# Altium PCB PCB1.PcbDoc
Units mm, origin at the board's own origin, x right, y up, seen from the top; angles counter-clockwise.
Board outline 149.99 x 90.04 mm, 2 copper layers (Top Layer, Bottom Layer); 22 components, 33 nets, 195 pads, 432 vias.
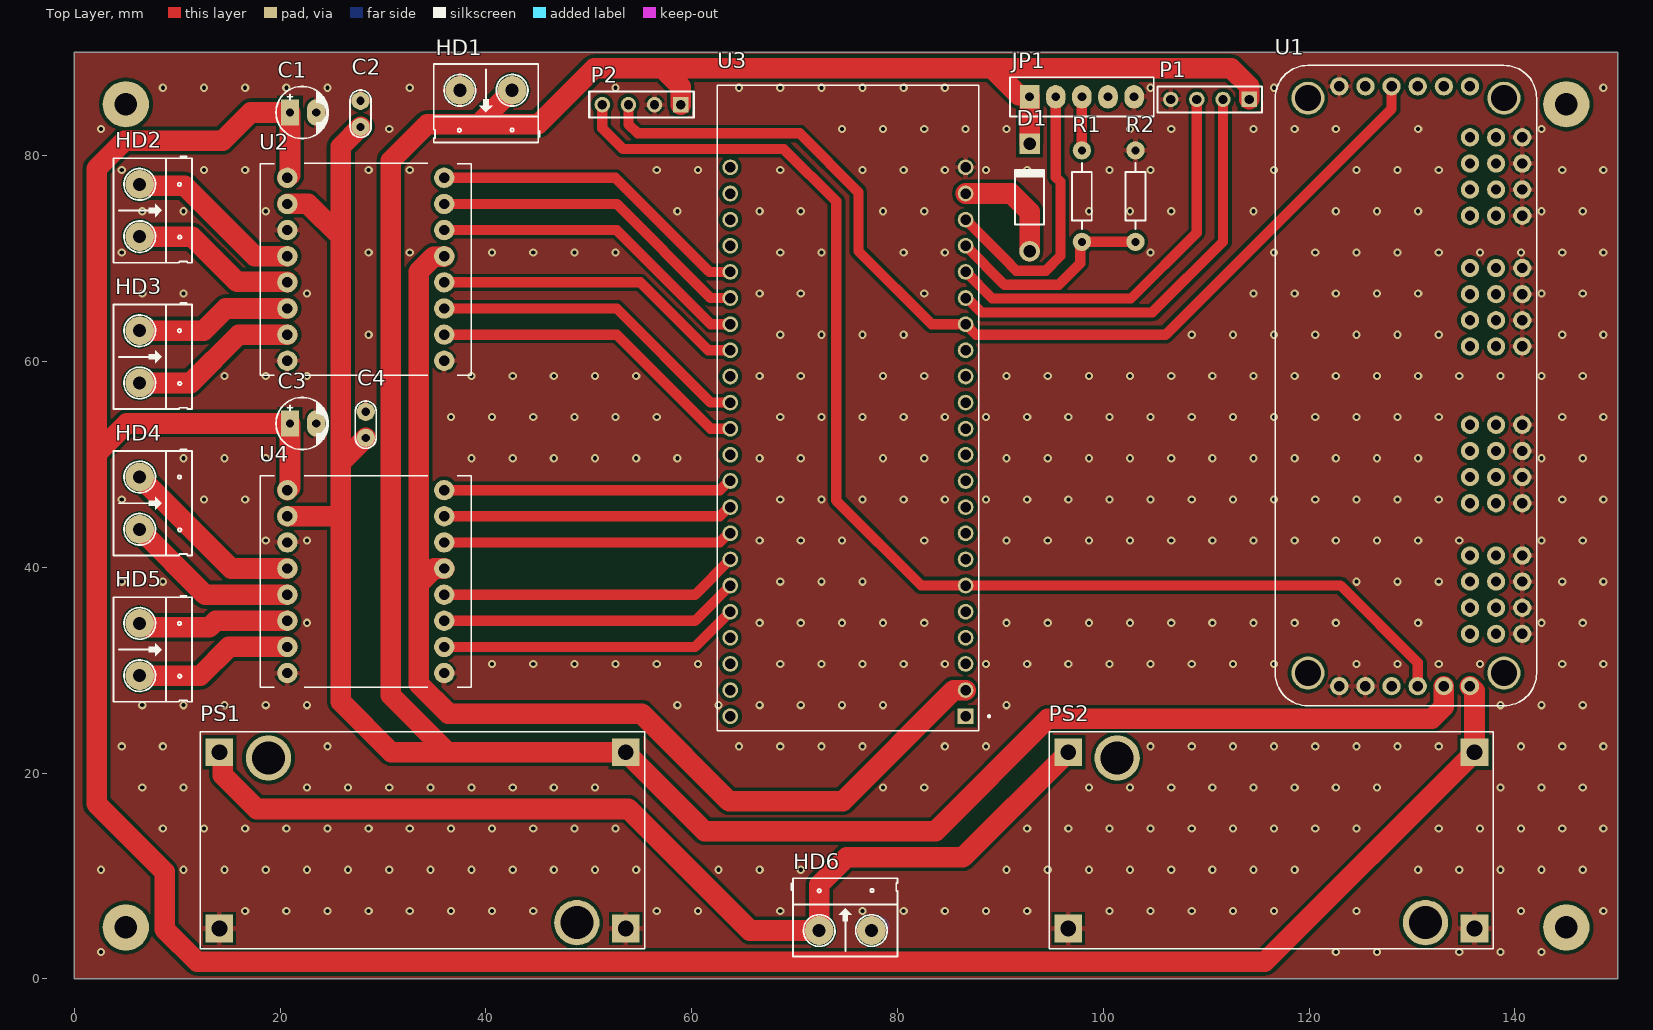
[diagram p0: Top Layer view]
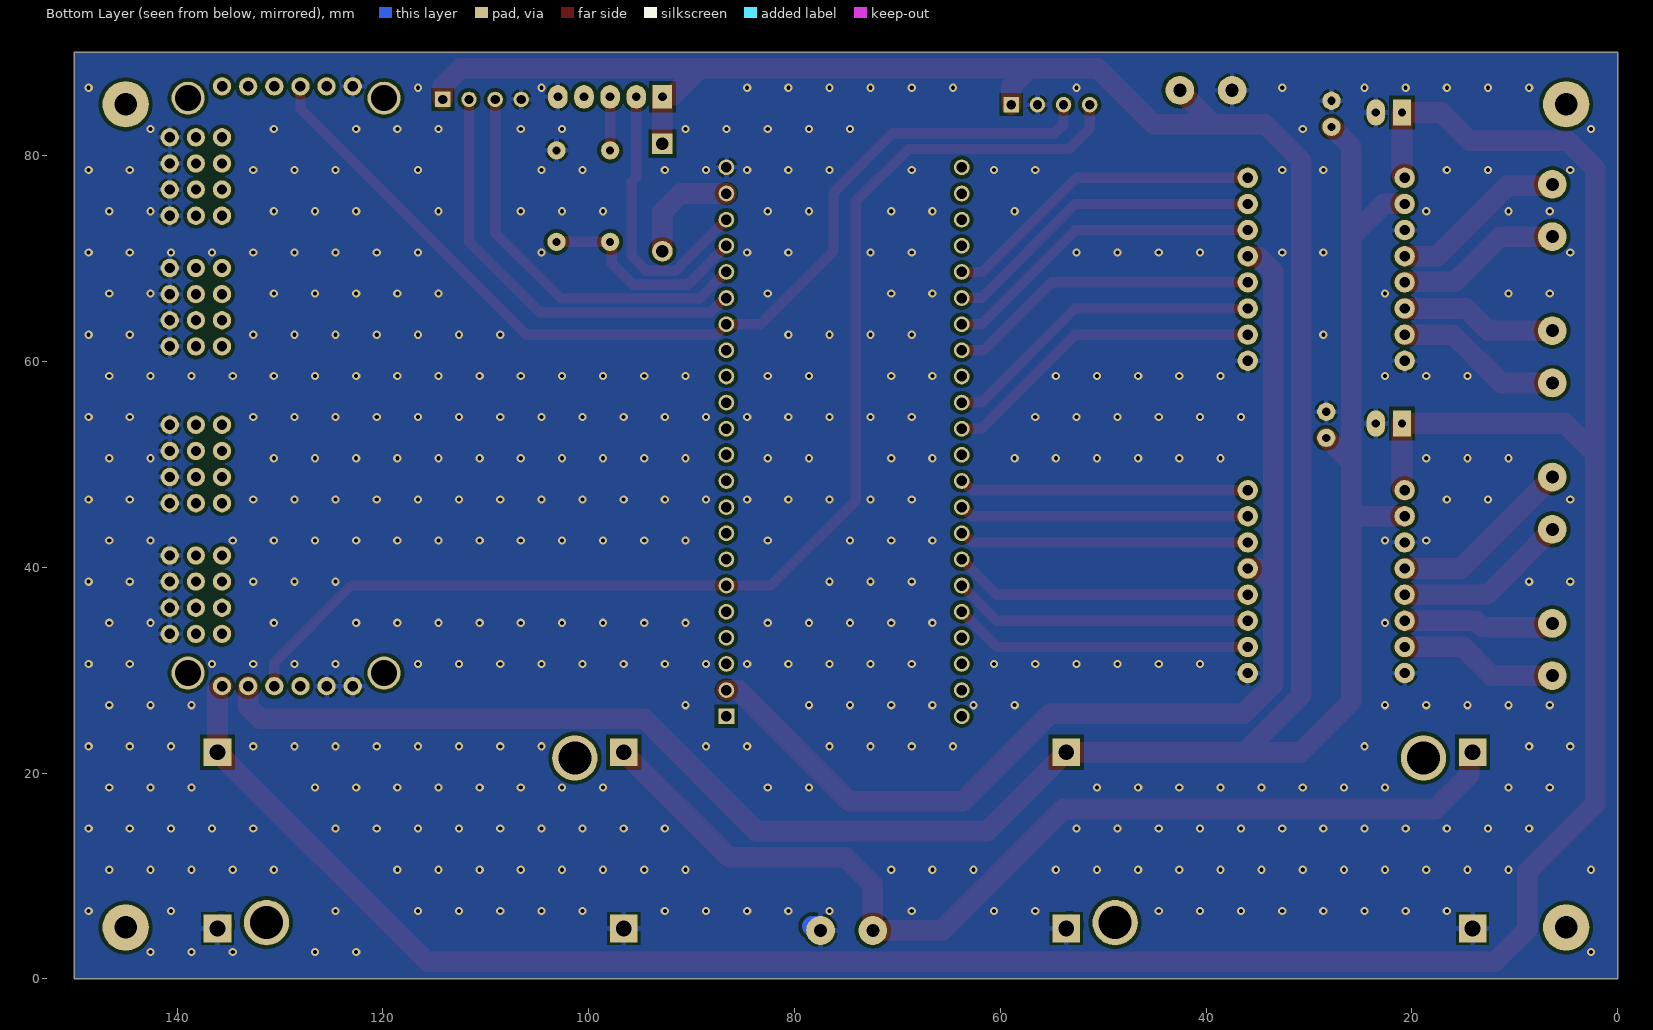
[diagram p1: Bottom Layer view, seen from below]
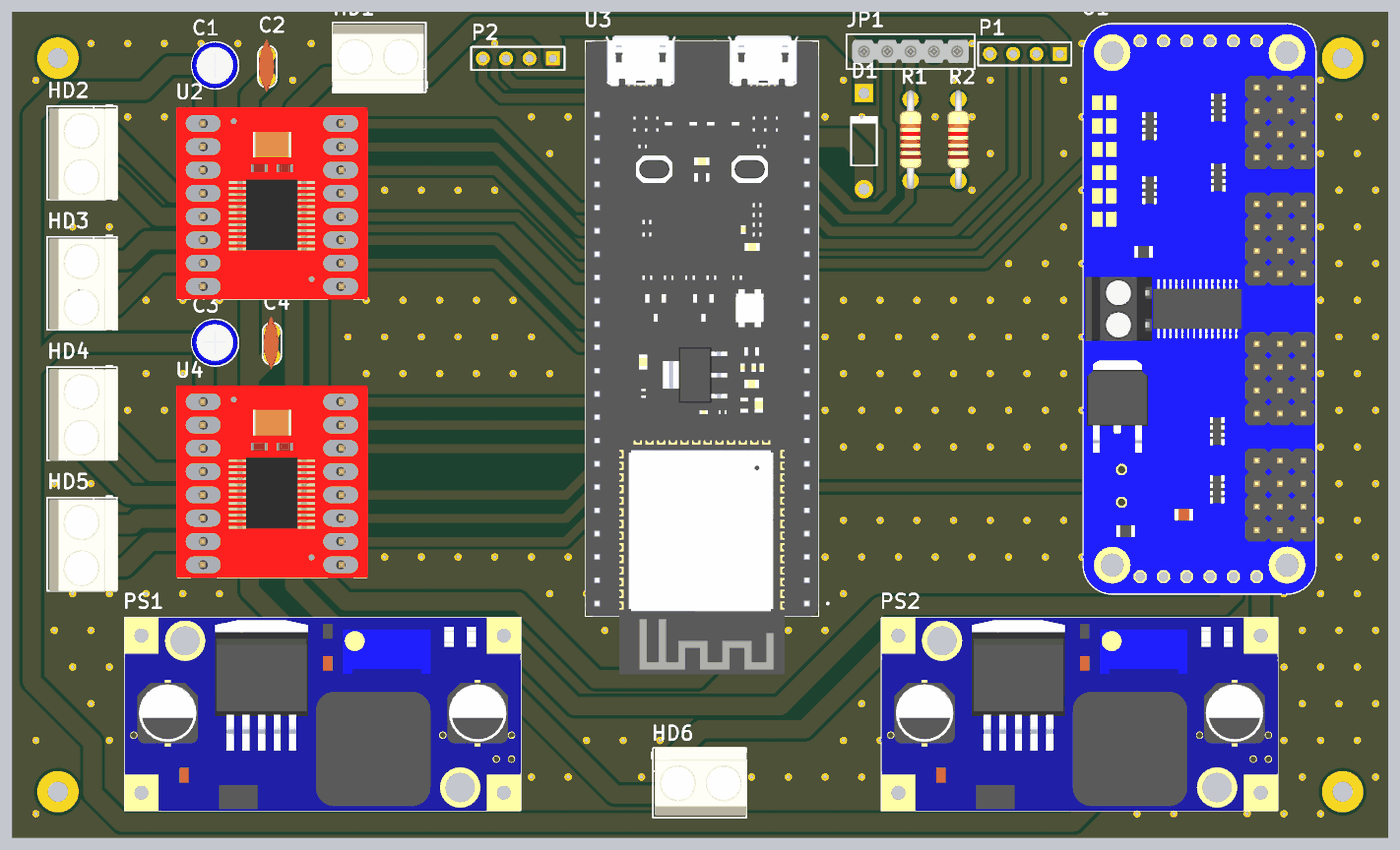
[diagram p2: 3D render of the assembled board from above, using the file's embedded part models]

## Layer stack, top to bottom
Top Solder: solder mask 0.0102, Solder Resist, Dk 3.5
Top Layer: signal copper 0.0356
Dielectric 1: dielectric 0.32, FR-4, Dk 4.8
Bottom Layer: signal copper 0.0356
Bottom Solder: solder mask 0.0102, Solder Resist, Dk 3.5

## Board outline
0,0 149.987,0 149.987,90.043 0,90.043

## Design rules (kind name [scope] priority, off if disabled: settings)
Clearance [All] p1: gap=0.35 ignorepadtopadclearanceinfootprint=FALSE
HoleSize [All] p1: absolutevalues=TRUE maxlimit=4 minlimit=0.025 maxpercent=80.000 minpercent=20.000
MinimumSolderMaskSliver [All] p1: minsoldermaskwidth=0.1
PolygonConnect [All] p1: connectstyle=Relief reliefconductorwidth=0.5 reliefentries=4 polygonreliefangle="90 Angle" airgapwidth=0.254
RoutingVias [All] p1: holewidth=0.711 width=1.27 viastyle="Through Hole" minholewidth=0.711 minwidth=1.27 maxholewidth=0.711 maxwidth=1.27
SilkToSilkClearance [All] p1 off: silktosilkclearance=0.254
SilkToSolderMaskClearance [IsPad] p1 off: minsilkscreentomaskgap=0.254 clearancetoexposedcopper=TRUE
SolderMaskExpansion [All] p1: expansion=0 istentingtop=FALSE
SupplyNets "Schematic Supply Nets_1" [InNet('GND_Logic')] p1: voltage=0.000
SupplyNets "Schematic Supply Nets_3" [InNet('6v')] p2: voltage=0.000
SupplyNets "Schematic Supply Nets_2" [InNet('5v1')] p3: voltage=0.000
SupplyNets "Schematic Supply Nets" [InNet('+12')] p4: voltage=0.000
Width [All] p1: maxlimit=2.5 minlimit=0.1 preferedwidth=2
26 further rules are at their usual default settings.

## Components (designator, comment, footprint, x,y, rotation, side; value= is the part's Value field where it differs from the comment)
C1 "470uf" CP1/2 20.955,84.201 r0 top
C2 "CAP gom" CN1 27.813,82.804 r90 top
C3 "470uf" CP1/2 20.955,53.975 r0 top
C4 "CAP gom" CN1 28.321,52.578 r90 top
D1 "Diode 11DQ03" DO-204AL 92.837,75.946 r90 top
HD1 "ESP32_Cam" HED2 42.545,86.36 r180 top value="Header 2"
HD2 "Trước-trái" HED2 6.35,77.216 r270 top value="Header 2"
HD3 "Trước-Phải" HED2 6.35,62.992 r270 top value="Header 2"
HD4 "Sau-Trái" HED2 6.35,48.768 r270 top value="Header 2"
HD5 "Sau-phải" HED2 6.35,34.544 r270 top value="Header 2"
HD6 "Header 2" HED2 72.39,4.699 r0 top
JP1 "HC-SR05" jam5 92.837,85.725 r180 top value="Connector 5"
P1 "Lida-x2" HDR1X4 114.173,85.471 r180 top
P2 "AS5600" HDR1X4 58.928,84.963 r180 top
PS1 "MC00100" CONV_MC00100 33.846,13.462 r0 top
PS2 "MC00100" CONV_MC00100 116.332,13.462 r0 top
R1 "1k" R1/4W 97.917,80.518 r270 top
R2 "2k" R1/4W 103.124,80.518 r270 top
U1 "PCA9685" MODULE_815 129.413,57.658 r90 top
U2 "TB6612FNG" TB6612FNG 28.321,68.961 r0 top
U3 "ESP32-S3-DEVKITC-1-N16R8V" XCVR_ESP32-S3-DEVKITC-1-N16R8V 75.184,55.497 r180 top
U4 "TB6612FNG" TB6612FNG 28.321,38.608 r0 top

## Footprints (in the part's own frame and the unit in brackets; to place one, negate y for a bottom-side part, rotate by r counter-clockwise, add the part's x,y. Pads: shape width x height; smd on the part's side, far side on the other; paste and mask are expansions set on the pad)
CN1 [mil]
  round 70 hole 31: 1(0,0) 2(100,0)
  silkscreen extent -40,-40 141,40, body extent -60,-30 170,37, height 265
CONV_MC00100 [mil]
  rect 105.63x105.63 / inner round 105.63 / far side rect 105.63x105.63 hole 60 mask+4.02: IN+(-777.5,337.5) IN-(-777.5,-337.5) OUT+(777.5,337.5) OUT-(777.5,-337.5)
  round 173.23 hole 125.98 mask+4.02: MH1(-590,315) MH2(590,-315)
  silkscreen extent -850,-415 850,415, body extent -850,-415 850,415, height 551
CP1/2 [mil]
  rect 70x100 hole 32: 1(0,0)
  oval 70x100 hole 32: 2(100,0)
  silkscreen extent -53,-100 147,100, body extent -54,-99 144,100, height 296
DO-204AL [mm] "Diode, Axial; Body 5.2 x 2.7 mm (LxDia. max), Lead Dia. 0.86 mm (max)"
  round 2 hole 1.2: 1(-5.23,0)
  rect 2x2 hole 1.2: 2(5.23,0)
  silkscreen extent -2.65,-1.41 2.75,1.4
HDR1X4 [mm] "Connector; Header; 4 Position"
  rect 1.5x1.5 hole 0.9: 1(0,0)
  round 1.5 hole 0.9: 2(2.54,0) 3(5.08,0) 4(7.62,0)
  silkscreen extent -1.27,-1.27 8.89,1.27, body extent -1.27,-1.27 8.89,1.27, height 7
HED2 [mil] "Header 2, 2 pin, hight 300mil, Pin to Pin 200, Colour Green"
  round 110 hole 50: 1(0,0) 2(200,0)
  silkscreen extent -106,-100 300,200, body extent -92,-90 302,205, height 394
jam5 [mil]
  rect 75x90 hole 34: 1(0,0)
  oval 75x90 hole 34: 2(-100,0) 3(-200,0) 4(-300,0) 5(-400,0)
  silkscreen extent -475,-75 75,75, body extent -450,-50 50,50, height 704
MODULE_815 [mil]
  round 70 hole 39.37: 0(-950,-245) 1(-850,-245) 2(-750,-245) 3(-650,-245) 4(-450,-245) 5(-350,-245) 6(-250,-245) 7(-150,-245) 8(150,-245) 9(250,-245) 10(350,-245) 11(450,-245) 12(650,-245) 13(750,-245) 14(850,-245) 15(950,-245) GND_3(-950,-445) GND_4(-850,-445) GND_5(-750,-445) GND_6(-650,-445) GND_7(-450,-445) GND_8(-350,-445) GND_9(-250,-445) GND_10(-150,-445) GND_11(150,-445) GND_12(250,-445) GND_13(350,-445) GND_14(450,-445) GND_15(650,-445) GND_16(750,-445) GND_17(850,-445) GND_18(950,-445) V+_3(-950,-345) V+_4(-850,-345) V+_5(-750,-345) V+_6(-650,-345) V+_7(-450,-345) V+_8(-350,-345) V+_9(-250,-345) V+_10(-150,-345) V+_11(150,-345) V+_12(250,-345) V+_13(350,-345) V+_14(450,-345) V+_15(650,-345) V+_16(750,-345) V+_17(850,-345) V+_18(950,-345)
  round 70 hole 40: GND_1(-1150,255) GND_2(1145,255) OE_1(-1150,155) OE_2(1145,155) SCL_1(-1150,55) SCL_2(1145,55) SDA_1(-1150,-45) SDA_2(1145,-45) V+_1(-1150,-245) V+_2(1145,-245) VCC_1(-1150,-145) VCC_2(1145,-145)
  round 125.98 hole 98.43: S1(-1100,375) S2(1100,375) S3(-1100,-375) S4(1100,-375)
  silkscreen extent -1225,-500 1225,500, body extent -1225,-500 1225,500, height 335
R1/4W [mil] "R 1/4W, 2 Pin, 350mil"
  round 70 hole 31: 1(0,0) 2(350,0)
  silkscreen extent 48,-38 302,38, body extent -40,-47 386,47, height 111
TB6612FNG [mm]
  round 1.98 hole 1: 1(-7.62,8.89) 2(-7.62,6.35) 3(-7.62,3.81) 4(-7.62,1.27) 5(-7.62,-1.27) 6(-7.62,-3.81) 7(-7.62,-6.35) 8(-7.62,-8.89) 9(7.62,-8.89) 10(7.62,-6.35) 11(7.62,-3.81) 12(7.62,-1.27) 13(7.62,1.27) 14(7.62,3.81) 15(7.62,6.35) 16(7.62,8.89)
  silkscreen extent -10.28,-10.29 10.28,10.29, body extent -10.45,-10.28 10.45,10.7, height 6.12
XCVR_ESP32-S3-DEVKITC-1-N16R8V [mm]
  rect 1.53x1.53 / inner round 1.53 / far side rect 1.53x1.53 hole 1.02 mask+0.102: J1_1(-11.43,29.97)
  round 1.53 hole 1.02 mask+0.102: J1_2(-11.43,27.43) J1_3(-11.43,24.89) J1_4(-11.43,22.35) J1_5(-11.43,19.81) J1_6(-11.43,17.27) J1_7(-11.43,14.73) J1_8(-11.43,12.19) J1_9(-11.43,9.65) J1_10(-11.43,7.11) J1_11(-11.43,4.57) J1_12(-11.43,2.03) J1_13(-11.43,-0.51) J1_14(-11.43,-3.05) J1_15(-11.43,-5.59) J1_16(-11.43,-8.13) J1_17(-11.43,-10.67) J1_18(-11.43,-13.21) J1_19(-11.43,-15.75) J1_20(-11.43,-18.29) J1_21(-11.43,-20.83) J1_22(-11.43,-23.37) J3_1(11.43,29.97) J3_2(11.43,27.43) J3_3(11.43,24.89) J3_4(11.43,22.35) J3_5(11.43,19.81) J3_6(11.43,17.27) J3_7(11.43,14.73) J3_8(11.43,12.19) J3_9(11.43,9.65) J3_10(11.43,7.11) J3_11(11.43,4.57) J3_12(11.43,2.03) J3_13(11.43,-0.51) J3_14(11.43,-3.05) J3_15(11.43,-5.59) J3_16(11.43,-8.13) J3_17(11.43,-10.67) J3_18(11.43,-13.21) J3_19(11.43,-15.75) J3_20(11.43,-18.29) J3_21(11.43,-20.83) J3_22(11.43,-23.37)
  silkscreen extent -13.82,-31.37 12.7,31.37, body extent -12.7,-31.96 12.7,37.68, height 7.39

## Part data
C1 C3: library part "CAP hoa", "Cap"
D1: "Schottky Rectifier", Code_JEDEC=DO-204-AL, ComponentLink1Description="Manufacturer Link", ComponentLink1URL=http://www.irf.com/, ComponentLink2Description=Datasheet, ComponentLink2URL=http://www.irf.com/product-info/datasheets/data/11dq03.pdf, DatasheetVersion=Dec-1997, LatestRevisionDate=17-Jul-2002, LatestRevisionNote="Re-released for DXP Platform.", PackageDescription="Diode, Axial; Body 5.2 x 2.7 mm (LxDia. max), Lead Dia. 0.86 mm (max)", PackageReference=DO-204AL, Published=8-Jun-2000, Publisher="Altium Limited"
HD1 HD2 HD3 HD4 HD5: library part "Header 2", "Header 2 (Green)"
HD6: "Header 2 (Green)"
JP1: library part "jam 5", "jam 5"
P1 P2: library part "Header 4", "Header, 4-Pin", LatestRevisionDate=17-Jul-2002, LatestRevisionNote="Re-released for DXP Platform.", Publisher="Altium Limited"
PS1 PS2: "DC-DC LM2596 Step Down Adjustable Converter Power Supply Module 1.3V-35V", Package=None, Check_prices=https://www.snapeda.com/parts/MC00100/YKS/view-part/?ref=eda, MF=YKS, MP=MC00100, SnapEDA_Link=https://www.snapeda.com/parts/MC00100/YKS/view-part/?ref=snap
R1 R2: library part Res, "Res"
U1: library part 815, "Adafruit 16-Channel 12-bit PWM/Servo Driver - I2C interface - PCA9685", Package="Non-Standard Adafruit", Check_prices=https://www.snapeda.com/parts/815/Adafruit+Industries/view-part/?ref=eda, MF=Adafruit, MP=815, SnapEDA_Link=https://www.snapeda.com/parts/815/Adafruit+Industries/view-part/?ref=snap
U2 U4: "TB6612FNG Dual Motor Driver Module", ComponentLink1Description="Data Sheet", ComponentLink1URL=https://www.pololu.com/file/0J86/TB6612FNG.pdf
U3: "Development Boards & Kits - Wireless Gen-Purpose Dev Board, embeds ESP32-S3-WROOM-2-N16R8V, 16 MB Octal Flash, 8 MB Octal PSRAM, with Pin Header", Package=None, Check_prices=https://www.snapeda.com/parts/ESP32-S3-DEVKITC-1-N16R8V/Espressif+Systems/view-part/?ref=eda, MF="Espressif Systems", MP=ESP32-S3-DEVKITC-1-N16R8V, SnapEDA_Link=https://www.snapeda.com/parts/ESP32-S3-DEVKITC-1-N16R8V/Espressif+Systems/view-part/?ref=snap

## Free pads (board coordinates)
  round 4.5 hole 2.2: MH1(5,5) MH2(145,5) MH3(145,85) MH4(5,85)

## Via types
v1: diameter 0.8, hole 0.4, Top Layer to Bottom Layer, 432 vias

## Nets (pads, with @x,y where several pads share a name; then routed paths per layer and width w, separated by ;. In a path a pad name is that pad's centre, name@x,y a point inside that pad or via, vN(x,y) a via of type N, cw(c..) or ccw(c..) an arc to the next point about the centre after c; other vN are vias at no path point)
5v1: C2.1 C4.1 D1.2 HD1.1 JP1.1 P1.1 P2.1 PS1.OUT+ U1.VCC_1 U2.2 U4.2 | length 357.4
  Top Layer w2: U4.2 24.892,44.958 ; U2.2 22.709,75.311 25.884,72.136 ; C2.1 25.884,80.875 25.884,72.136 ; C4.1 26.035,50.292 25.884,50.443 ; HD1.1 39.243,83.058 ; P2.1 58.928,86.717 57.15,88.495 ; D1.2 JP1.1 ; JP1.1@92.837,85.82 92.789,85.868 91.805,85.868 90.35,87.323 90.35,87.325 89.325,88.35 89.323,88.35 89.178,88.495 ; P1.1 114.173,86.741 112.419,88.495 89.178,88.495 ; U1.VCC_1 133.096,26.445 131.924,25.273 94.615,25.273 83.693,14.351 61.277,14.351 PS1.OUT+ 36.258,22.034 ; 25.884,50.443 25.884,26.948 30.797,22.034 36.258,22.034 ; 25.884,50.443 25.884,72.136 ; 36.258,22.034 30.734,27.559 30.734,79.502 34.29,83.058 39.243,83.058 ; 39.243,83.058 45.085,83.058 50.522,88.495 57.15,88.495 ; 57.15,88.495 89.178,88.495
6v: C1.1 C3.1 PS2.OUT+ U1.V+_1 U2.1 U4.1 | length 274.4
  Top Layer w2: U4.1 20.955,47.752 C3.1 5.08,53.975 2.159,51.054 ; U2.1 20.955,78.105 C1.1 17.145,84.201 14.396,81.452 4.871,81.452 2.159,78.74 2.159,51.054 ; U1.V+_1 136.081,28.003 PS2.OUT+ 115.697,1.651 11.938,1.651 8.763,4.826 8.763,10.414 2.159,17.018 2.159,51.054
+12: HD6.1 PS1.IN+ PS2.IN+ | length 100.6
  Top Layer w2: PS1.IN+ 14.439,21.693 14.439,19.788 17.716,16.51 53.848,16.51 65.659,4.699 HD6.1 72.398,4.707 72.398,9.152 75.057,11.811 86.36,11.811 PS2.IN+
GND_Logic: C1.2 C2.2 C3.2 C4.2 HD1.2 HD6.2 JP1.5 P1.4 P2.2 PS1.IN- PS1.OUT- PS2.IN- PS2.OUT- R2.1 U1.GND_1 U1.GND_2 U1.GND_3 U1.GND_4 U1.GND_5 U1.GND_6 U1.GND_7 U1.GND_8 U1.GND_9 U1.GND_10 U1.GND_11 U1.GND_12 U1.GND_13 U1.GND_14 U1.GND_15 U1.GND_16 U1.GND_17 U1.GND_18 U1.OE_1 U2.3 U2.8 U2.9 U3.J1_22 U4.3 U4.8 U4.9 | length 1.9
  Bottom Layer w2: PS1.OUT-@53.252,5.231 PS1.OUT- ; HD6.2 77.685,4.699 78.082,5.096 HD6.2@78.248,5.096 ; PS2.OUT-@135.739,5.231 PS2.OUT-
  other v1: 2.6,2.6 122.6,2.6 126.6,2.6 134.6,2.6 138.6,2.6 142.6,2.6 16.6,6.6 20.6,6.6 24.6,6.6 28.6,6.6 32.6,6.6 36.6,6.6 40.6,6.6 44.6,6.6 56.6,6.6 60.6,6.6 68.6,6.6 76.6,6.6 80.6,6.6 84.6,6.6 88.6,6.6 92.6,6.6 100.6,6.6 104.6,6.6 108.6,6.6 112.6,6.6 116.6,6.6 124.6,6.6 140.6,6.6 148.6,6.6 2.6,10.6 10.6,10.6 14.6,10.6 18.6,10.6 22.6,10.6 26.6,10.6 30.6,10.6 34.6,10.6 38.6,10.6 42.6,10.6 46.6,10.6 50.6,10.6 54.6,10.6 62.6,10.6 66.6,10.6 70.6,10.6 90.6,10.6 94.6,10.6 98.6,10.6 102.6,10.6 106.6,10.6 110.6,10.6 114.6,10.6 118.6,10.6 130.6,10.6 134.6,10.6 138.6,10.6 142.6,10.6 146.6,10.6 8.6,14.6 12.6,14.6 16.6,14.6 20.6,14.6 24.6,14.6 28.6,14.6 32.6,14.6 36.6,14.6 40.6,14.6 44.6,14.6 48.6,14.6 52.6,14.6 92.6,14.6 96.6,14.6 100.6,14.6 104.6,14.6 108.6,14.6 112.6,14.6 116.6,14.6 120.6,14.6 124.6,14.6 132.6,14.6 136.6,14.6 140.6,14.6 144.6,14.6 148.6,14.6 6.6,18.6 10.6,18.6 22.6,18.6 26.6,18.6 30.6,18.6 34.6,18.6 38.6,18.6 42.6,18.6 46.6,18.6 50.6,18.6 78.6,18.6 82.6,18.6 98.6,18.6 102.6,18.6 106.6,18.6 110.6,18.6 114.6,18.6 118.6,18.6 122.6,18.6 126.6,18.6 138.6,18.6 142.6,18.6 146.6,18.6 4.6,22.6 8.6,22.6 24.6,22.6 64.6,22.6 68.6,22.6 72.6,22.6 76.6,22.6 84.6,22.6 88.6,22.6 104.6,22.6 108.6,22.6 112.6,22.6 116.6,22.6 120.6,22.6 124.6,22.6 128.6,22.6 132.6,22.6 140.6,22.6 144.6,22.6 148.6,22.6 6.6,26.6 10.6,26.6 14.6,26.6 18.6,26.6 22.6,26.6 58.6,26.6 62.6,26.6 66.6,26.6 70.6,26.6 74.6,26.6 78.6,26.6 90.6,26.6 138.6,26.6 142.6,26.6 146.6,26.6 40.6,30.6 44.6,30.6 48.6,30.6 52.6,30.6 56.6,30.6 60.6,30.6 68.6,30.6 72.6,30.6 76.6,30.6 80.6,30.6 84.6,30.6 88.6,30.6 92.6,30.6 96.6,30.6 100.6,30.6 104.6,30.6 108.6,30.6 112.6,30.6 116.6,30.6 124.6,30.6 128.6,30.6 132.6,30.6 136.6,30.6 144.6,30.6 148.6,30.6 22.6,34.6 66.6,34.6 70.6,34.6 74.6,34.6 78.6,34.6 82.6,34.6 90.6,34.6 94.6,34.6 98.6,34.6 102.6,34.6 106.6,34.6 110.6,34.6 114.6,34.6 118.6,34.6 122.6,34.6 130.6,34.6 142.6,34.6 146.6,34.6 4.6,38.6 8.6,38.6 68.6,38.6 72.6,38.6 76.6,38.6 124.6,38.6 128.6,38.6 132.6,38.6 144.6,38.6 148.6,38.6 18.6,42.6 22.6,42.6 66.6,42.6 70.6,42.6 74.6,42.6 82.6,42.6 90.6,42.6 94.6,42.6 98.6,42.6 102.6,42.6 106.6,42.6 110.6,42.6 114.6,42.6 118.6,42.6 122.6,42.6 126.6,42.6 130.6,42.6 134.6,42.6 142.6,42.6 146.6,42.6 4.6,46.6 12.6,46.6 16.6,46.6 68.6,46.6 72.6,46.6 76.6,46.6 80.6,46.6 84.6,46.6 88.6,46.6 92.6,46.6 96.6,46.6 100.6,46.6 104.6,46.6 108.6,46.6 112.6,46.6 116.6,46.6 120.6,46.6 124.6,46.6 128.6,46.6 132.6,46.6 144.6,46.6 148.6,46.6 10.6,50.6 14.6,50.6 18.6,50.6 38.6,50.6 42.6,50.6 46.6,50.6 50.6,50.6 54.6,50.6 58.6,50.6 66.6,50.6 70.6,50.6 78.6,50.6 82.6,50.6 90.6,50.6 94.6,50.6 98.6,50.6 102.6,50.6 106.6,50.6 110.6,50.6 114.6,50.6 118.6,50.6 122.6,50.6 126.6,50.6 130.6,50.6 142.6,50.6 146.6,50.6 36.6,54.6 40.6,54.6 44.6,54.6 48.6,54.6 52.6,54.6 56.6,54.6 68.6,54.6 72.6,54.6 76.6,54.6 80.6,54.6 84.6,54.6 88.6,54.6 92.6,54.6 96.6,54.6 100.6,54.6 104.6,54.6 108.6,54.6 112.6,54.6 116.6,54.6 120.6,54.6 124.6,54.6 128.6,54.6 132.6,54.6 144.6,54.6 148.6,54.6 14.6,58.6 18.6,58.6 22.6,58.6 38.6,58.6 42.6,58.6 46.6,58.6 50.6,58.6 54.6,58.6 66.6,58.6 70.6,58.6 78.6,58.6 82.6,58.6 90.6,58.6 94.6,58.6 98.6,58.6 102.6,58.6 106.6,58.6 110.6,58.6 114.6,58.6 118.6,58.6 122.6,58.6 126.6,58.6 130.6,58.6 134.6,58.6 138.6,58.6 142.6,58.6 146.6,58.6 28.6,62.6 68.6,62.6 72.6,62.6 76.6,62.6 80.6,62.6 108.6,62.6 112.6,62.6 116.6,62.6 120.6,62.6 124.6,62.6 128.6,62.6 132.6,62.6 144.6,62.6 148.6,62.6 6.6,66.6 10.6,66.6 22.6,66.6 66.6,66.6 70.6,66.6 82.6,66.6 114.6,66.6 118.6,66.6 122.6,66.6 126.6,66.6 130.6,66.6 142.6,66.6 146.6,66.6 4.6,70.6 28.6,70.6 32.6,70.6 40.6,70.6 44.6,70.6 48.6,70.6 52.6,70.6 68.6,70.6 72.6,70.6 80.6,70.6 84.6,70.6 104.6,70.6 116.6,70.6 120.6,70.6 124.6,70.6 128.6,70.6 132.6,70.6 136.6,70.6 140.6,70.6 144.6,70.6 148.6,70.6 6.6,74.6 10.6,74.6 18.6,74.6 58.6,74.6 66.6,74.6 70.6,74.6 78.6,74.6 82.6,74.6 98.6,74.6 102.6,74.6 106.6,74.6 114.6,74.6 122.6,74.6 126.6,74.6 130.6,74.6 142.6,74.6 146.6,74.6 4.6,78.6 12.6,78.6 16.6,78.6 28.6,78.6 32.6,78.6 56.6,78.6 60.6,78.6 68.6,78.6 76.6,78.6 80.6,78.6 84.6,78.6 88.6,78.6 92.6,78.6 100.6,78.6 104.6,78.6 116.6,78.6 124.6,78.6 128.6,78.6 132.6,78.6 144.6,78.6 148.6,78.6 2.6,82.6 30.6,82.6 74.6,82.6 78.6,82.6 82.6,82.6 86.6,82.6 90.6,82.6 102.6,82.6 106.6,82.6 114.6,82.6 118.6,82.6 122.6,82.6 130.6,82.6 142.6,82.6 8.6,86.6 12.6,86.6 16.6,86.6 20.6,86.6 24.6,86.6 32.6,86.6 52.6,86.6 64.6,86.6 68.6,86.6 72.6,86.6 76.6,86.6 80.6,86.6 84.6,86.6 104.6,86.6 116.6,86.6 148.6,86.6
HC-SR05.1: JP1.2 U3.J1_20 | length 27.6
  Top Layer w1: U3.J1_20 90.987,69.414 90.987,69.364 91.531,68.82 94.397,68.82 95.837,70.26 95.837,77.458 95.377,77.918 JP1.2
HC-SR05.2: JP1.3 R1.1 | length 5.2
  Top Layer w1: R1.1@97.917,80.543 JP1.3
LIDA-EN: P1.3 U3.J1_18 | length 39.3
  Top Layer w1: U3.J1_18 89.201,66.12 102.696,66.12 109.093,72.517 P1.3@109.093,85.634
LIDA-TX: P1.2 U3.J1_17 | length 42.3
  Top Layer w1: U3.J1_17 86.757,66.167 88.154,64.77 104.775,64.77 111.633,71.628 P1.2
M1.1: U2.13 U3.J1_2 U4.13 | length 108.6
  Top Layer w2: U4.13 34.96,39.878 33.451,38.369 ; U2.13 35.891,70.181 34.91,70.181 33.451,68.722 33.451,38.369 ; U3.J1_2 85.471,28.067 74.676,17.272 63.627,17.272 55.118,25.781 36.357,25.781 33.451,28.687 33.451,38.369
M1.2: U2.16 U3.J3_18 | length 31.6
  Top Layer w1: U2.16 52.578,77.851 61.722,68.707 U3.J3_18
M1.3: U2.14 U3.J3_16 | length 31.6
  Top Layer w1: U2.14 52.705,72.771 61.849,63.627 U3.J3_16
M1.4: U2.15 U3.J3_17 | length 31.6
  Top Layer w1: U2.15 52.705,75.311 61.849,66.167 U3.J3_17
M1.5: HD2.1 U2.4 | length 17.2
  Top Layer w2: HD2.1 6.502,77.064 10.717,77.064 17.55,70.231 U2.4
M1.6: HD2.2 U2.5 | length 16.2
  Top Layer w2: HD2.2 11.43,72.136 15.835,67.731 20.661,67.731 U2.5
M1.7: U2.10 U3.J3_12 | length 31.6
  Top Layer w1: U2.10 52.705,62.611 61.849,53.467 U3.J3_12
M1.8: U2.12 U3.J3_15 | length 30.5
  Top Layer w1: U2.12 54.991,67.691 61.595,61.087 U3.J3_15
M1.9: U2.11 U3.J3_13 | length 31.6
  Top Layer w1: U2.11 52.705,65.151 61.849,56.007 U3.J3_13
M1.10: HD3.1 U2.6 | length 15.2
  Top Layer w2: HD3.1 12.553,62.992 14.712,65.151 U2.6
M1.11: HD3.2 U2.7 | length 16.3
  Top Layer w2: HD3.2 11.283,57.912 15.982,62.611 U2.7
M1.12: U3.J3_10 U4.16 | length 28.2
  Top Layer w1: U4.16 62.722,47.498 63.611,48.387 U3.J3_10
M1.13: U3.J3_8 U4.14 | length 28.2
  Top Layer w1: U4.14 62.722,42.418 63.611,43.307 U3.J3_8
M1.14: U3.J3_9 U4.15 | length 28.2
  Top Layer w1: U4.15 62.722,44.958 63.611,45.847 U3.J3_9
M1.15: HD4.1 U4.4 | length 18
  Top Layer w2: HD4.1 15.24,39.878 U4.4
M1.16: HD4.2 U4.5 | length 17
  Top Layer w2: HD4.2 12.7,37.338 U4.5
M1.17: U3.J3_5 U4.10 | length 29.2
  Top Layer w1: U4.10 60.325,32.258 U3.J3_5
M1.18: U3.J3_7 U4.12 | length 29.2
  Top Layer w1: U4.12 60.325,37.338 U3.J3_7
M1.19: U3.J3_6 U4.11 | length 29.2
  Top Layer w1: U4.11 60.325,34.798 U3.J3_6
M1.20: HD5.1 U4.6 | length 14.8
  Top Layer w2: HD5.1 6.502,34.392 7.063,34.392 7.292,34.163 13.125,34.163 13.76,34.798 U4.6
M1.21: HD5.2 U4.7 | length 15.5
  Top Layer w2: HD5.2 12.236,29.464 15.03,32.258 U4.7
NetD1_1: D1.1 U3.J1_21 | length 10.8
  Top Layer w2: U3.J1_21 91.059,76.327 92.837,74.549 D1.1
NetR1_2: R1.2 R2.2 U3.J1_19 | length 20.9
  Top Layer w1: U3.J1_19 90.391,67.47 95.689,67.47 97.768,69.549 97.768,71.479 R1.2 R2.2
SV1.1: P2.3 U1.SCL_2 U3.J1_16 | length 99.2
  Top Layer w1: P2.3 53.848,83.058 54.737,82.169 70.485,82.169 76.2,76.454 76.2,70.739 83.312,63.627 U3.J1_16 87.63,62.611 106.049,62.611 128.016,84.578 U1.SCL_2
SV1.2: P2.4 U1.SDA_1 U3.J1_6 | length 122.4
  Top Layer w1: P2.4 51.308,82.677 53.34,80.645 68.961,80.645 74.041,75.565 74.041,46.482 82.296,38.227 U3.J1_6 123.063,38.227 130.556,30.734 U1.SDA_1
pads on no net: JP1.4 PS1.MH1 PS1.MH2 PS2.MH1 PS2.MH2 U1.0 U1.1 U1.2 U1.3 U1.4 U1.5 U1.6 U1.7 U1.8 U1.9 U1.10 U1.11 U1.12 U1.13 U1.14 U1.15 U1.OE_2 U1.S1 U1.S2 U1.S3 U1.S4 U1.SCL_1 U1.SDA_2 U1.V+_2 U1.V+_3 U1.V+_4 U1.V+_5 U1.V+_6 U1.V+_7 U1.V+_8 U1.V+_9 U1.V+_10 U1.V+_11 U1.V+_12 U1.V+_13 U1.V+_14 U1.V+_15 U1.V+_16 U1.V+_17 U1.V+_18 U1.VCC_2 U3.J1_1 U3.J1_3 U3.J1_4 U3.J1_5 U3.J1_7 U3.J1_8 U3.J1_9 U3.J1_10 U3.J1_11 U3.J1_12 U3.J1_13 U3.J1_14 U3.J1_15 U3.J3_1 U3.J3_2 U3.J3_3 U3.J3_4 U3.J3_11 U3.J3_14 U3.J3_19 U3.J3_20 U3.J3_21 U3.J3_22

## Polygon pours and split planes (outlines as drawn)
GND_Logic on Top Layer "GND_LOGIC_L01_P000" (solid, remove dead copper, pour order 0): 0,90.043 149.987,90.043 149.987,0 0,0
GND_Logic on Bottom Layer "GND_LOGIC_L02_P001" (solid, remove dead copper, pour order 1): 0,0 0,90.043 149.987,90.043 149.987,0

## Silkscreen, mask and mechanical layers (free items; w line width, h text height)
Mechanical 1:
  lines w0.254: 0,0 150,0 150,90 0,90 0,0

## Text inside footprints (layer, text, board x,y; h text height)
PS1: Mechanical 13 "OUT+" at 50.346,18.962 h1.27; Mechanical 13 "OUT-" at 50.845,6.712 h1.27; Mechanical 13 "IN-" at 12.845,6.712 h1.27; Mechanical 13 "IN+" at 12.845,18.962 h1.27
PS2: Mechanical 13 "OUT+" at 132.832,18.962 h1.27; Mechanical 13 "OUT-" at 133.332,6.712 h1.27; Mechanical 13 "IN-" at 95.332,6.712 h1.27; Mechanical 13 "IN+" at 95.332,18.962 h1.27